# Altium PCB GripperBottomBoard.PcbDoc (part 4 of 4)
Units mm, origin at the board's own origin, x right, y up, seen from the top; angles counter-clockwise.
Board outline 79.5 x 85 mm, 6 copper layers (Top Layer, GND 01, SIG 01, PWR, GND 02, Bottom Layer), stack 1.705 mm thick; 155 components, 93 nets, 613 pads, 240 vias.
Unrouted connection lines stored in the file: 155.
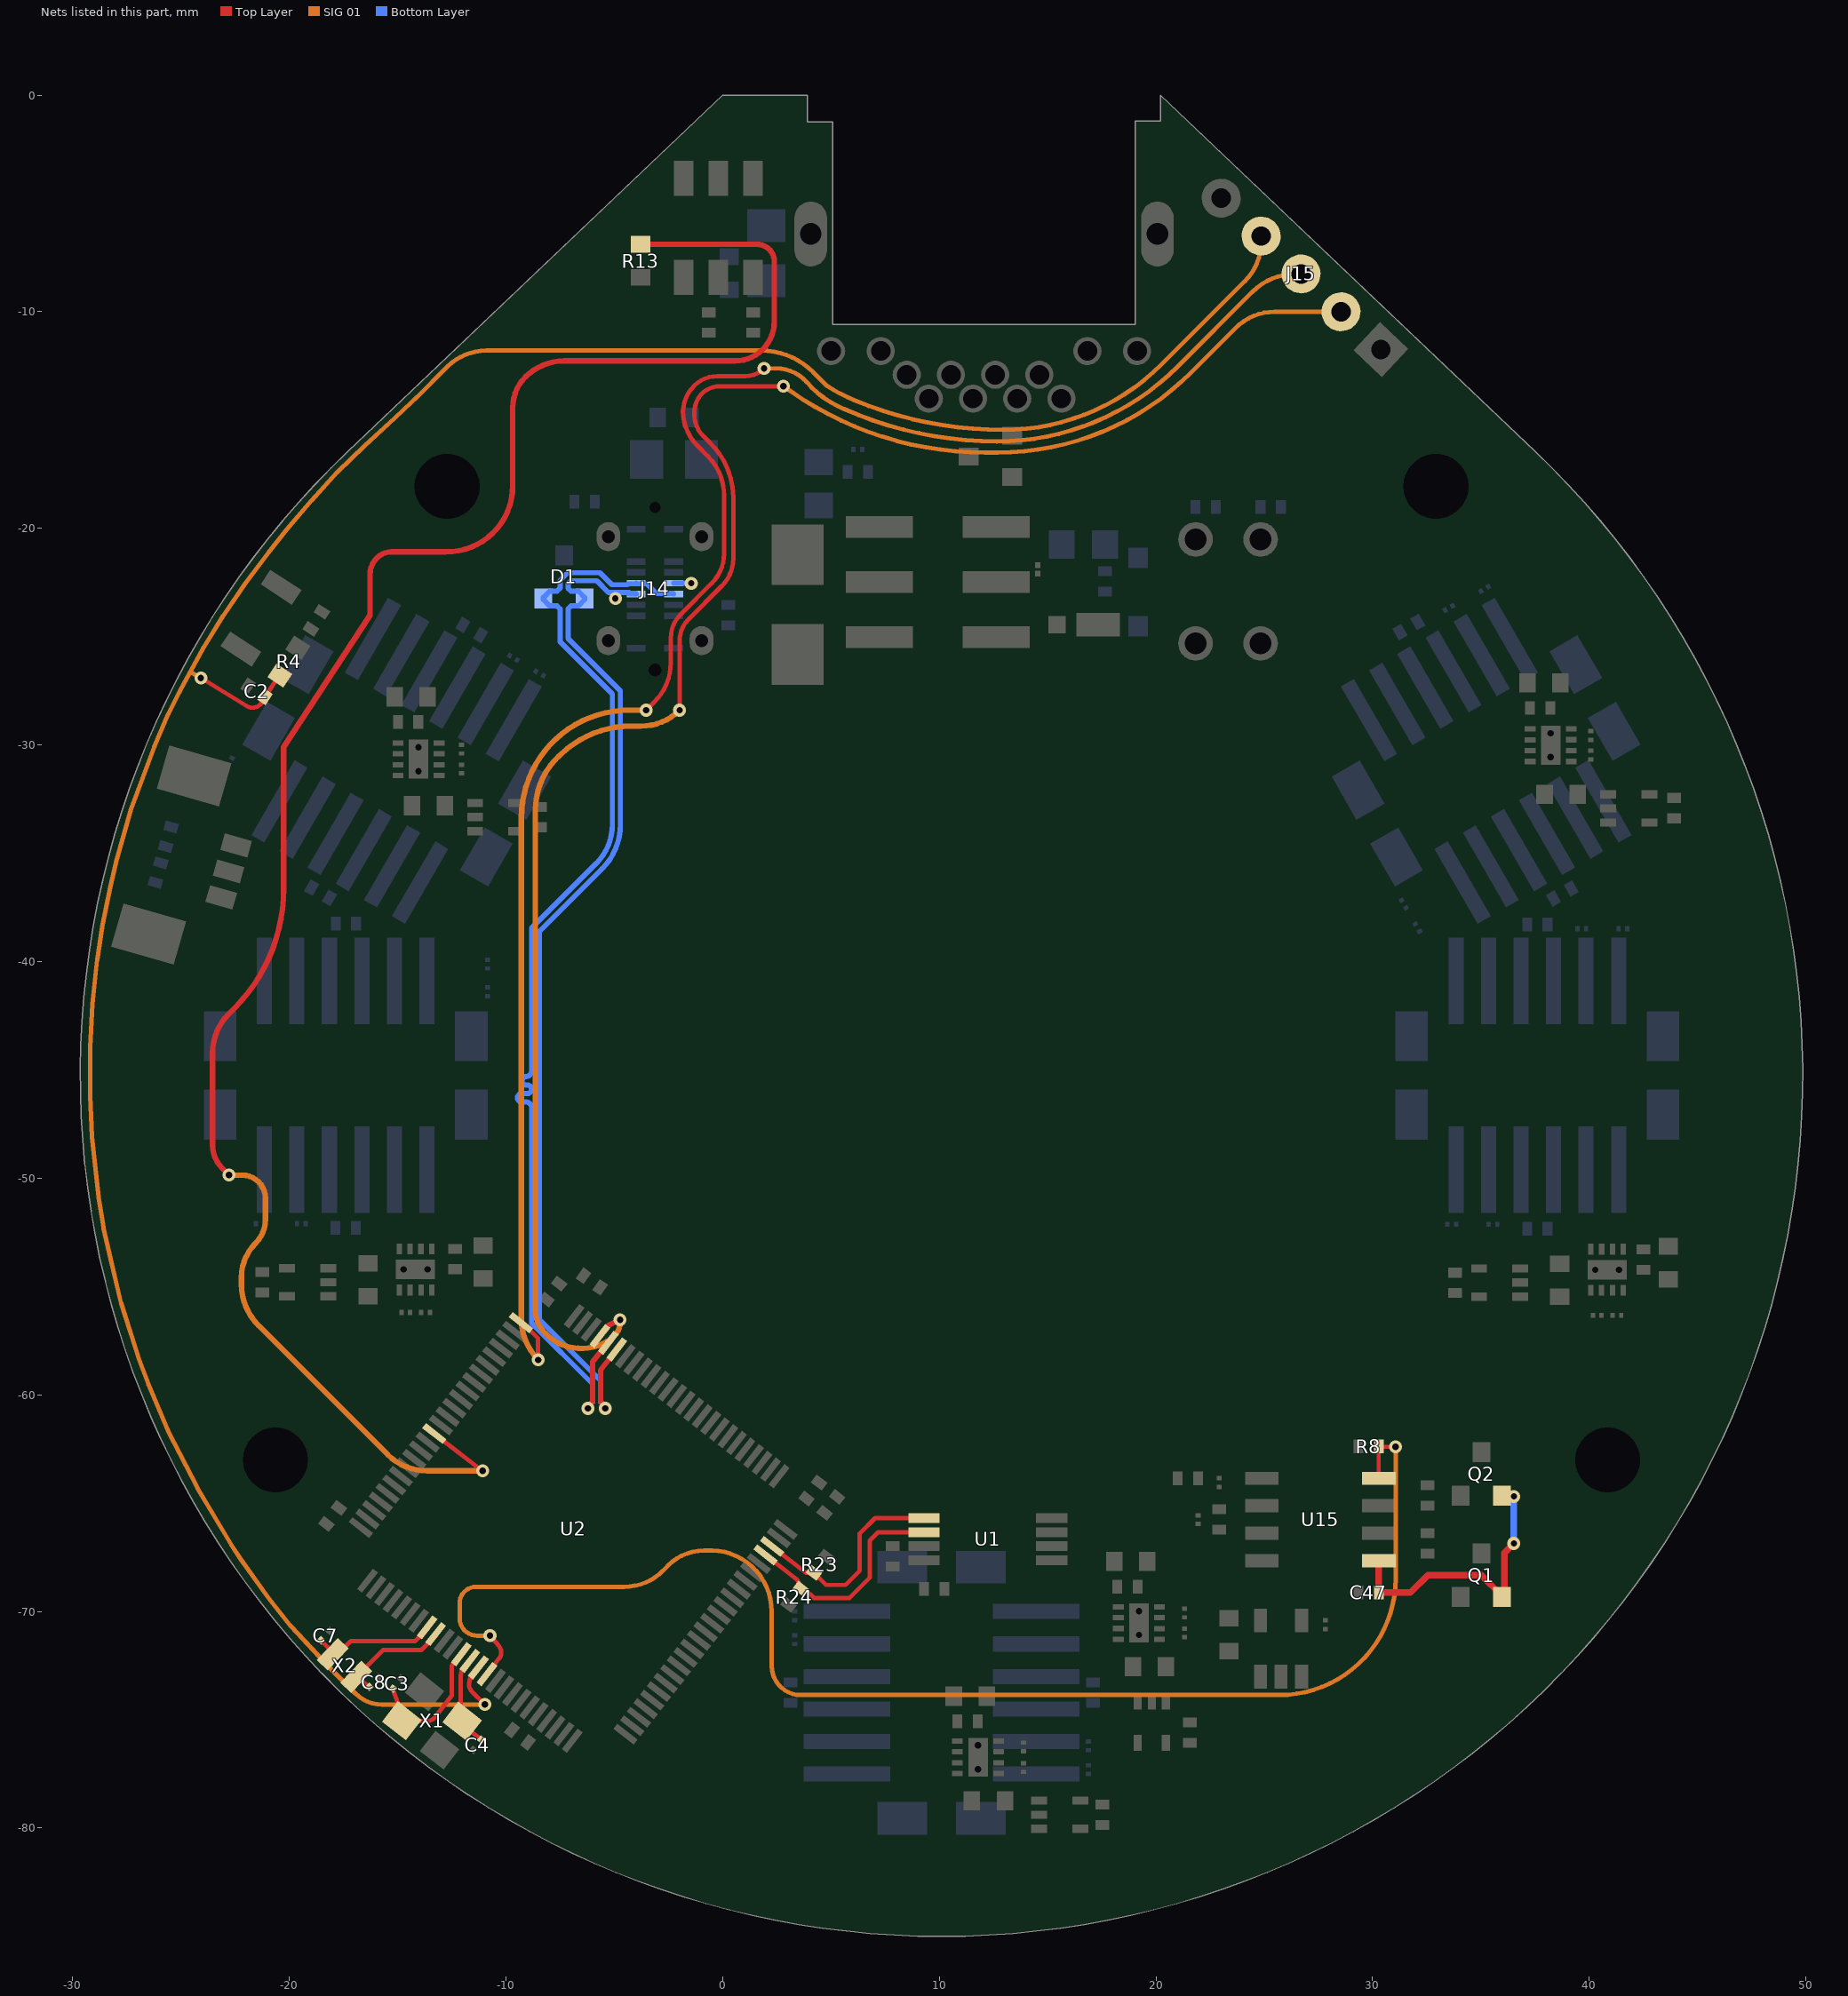
[diagram p7: the nets of this part, all layers, seen from the top]

## Via types
v1: diameter 0.6, hole 0.3, Top Layer to Bottom Layer, tented both sides, 240 vias

## Nets (pads, with @x,y where several pads share a name; then routed paths per layer and width w, separated by ;. In a path a pad name is that pad's centre, name@x,y a point inside that pad or via, vN(x,y) a via of type N, cw(c..) or ccw(c..) an arc to the next point about the centre after c; other vN are vias at no path point) (continued)
NRST: C2.2 J15.4 R4.1 U2.14 | length 125.8
  Top Layer w0.203: v1(-24.083,-26.901) -21.948,-28.21 ccw(c-21.694,-27.802) -21.629,-28.278 ccw(c-21.697,-27.78) -21.275,-28.054 -21.22,-27.968 C2.2@-21.12,-27.775 -20.997,-27.598 -20.615,-27.009 R4.1@-20.437,-26.792 R4.1@-20.431,-26.825 ; U2.14@-11.425,-72.734 -11.437,-72.746 ccw(c-10.8,-73.382) -11.584,-72.94 ccw(c-10.8,-73.382) -11.699,-73.326 ccw(c-10.8,-73.382) -11.7,-73.382 ccw(c-11.246,-73.382) -11.567,-73.704 v1(-10.977,-74.294)
  SIG 01 w0.203: -29.185,-46.201 ccw(c-28.981,-46.197) -29.184,-46.206 -29.109,-48.075 ccw(c-28.906,-48.067) -29.108,-48.088 -28.804,-50.871 ; -29.185,-46.2 -29.189,-45.89 -29.195,-45.883 -29.195,-43.951 -29.096,-41.98 cw(c-28.893,-41.991) -29.095,-41.97 -28.872,-39.915 cw(c-28.67,-39.937) -28.871,-39.907 ; -28.871,-39.906 -28.637,-38.407 cw(c-28.436,-38.438) -28.635,-38.397 -28.265,-36.588 cw(c-28.066,-36.628) -28.264,-36.584 -28.007,-35.43 cw(c-27.808,-35.474) -28.004,-35.419 -27.306,-32.952 cw(c-27.111,-33.006) -27.301,-32.935 -26.229,-30.075 cw(c-26.039,-30.146) -26.226,-30.066 -25.586,-28.569 cw(c-25.399,-28.649) -25.58,-28.555 -25.072,-27.572 -24.814,-27.071 cw(c-24.633,-27.163) -24.811,-27.066 -24.57,-26.626 -23.946,-25.486 cw(c-23.767,-25.584) -23.94,-25.477 -23.048,-24.026 cw(c-22.874,-24.132) -23.042,-24.018 -22.028,-22.528 cw(c-21.859,-22.641) -22.022,-22.519 -20.977,-21.134 cw(c-20.814,-21.256) -20.974,-21.13 -20.108,-20.041 cw(c-19.949,-20.167) -20.104,-20.036 -18.984,-18.717 -17.779,-17.403 cw(c-17.629,-17.541) -17.77,-17.395 -16.53,-16.194 cw(c-16.388,-16.34) -16.526,-16.191 -15.124,-14.893 -14.357,-14.178 -14.292,-14.113 cw(c-11.388,-17.017) -14.112,-13.943 -12.708,-12.54 cw(c-10.912,-14.336) -10.912,-11.796 1.792,-11.796 cw(c1.794,-15.154) 4.168,-12.778 4.775,-13.385 4.789,-13.4 ccw(c8.945,-7.157) 6.071,-14.084 ccw(c12.95,2.506) 12.961,-15.454 ccw(c12.958,-5.129) 20.259,-12.429 24.109,-8.579 ccw(c22.313,-6.783) 24.853,-6.783 J15.4@24.853,-6.507 ; -28.804,-50.872 ccw(c-28.602,-50.849) -28.803,-50.882 -28.602,-52.13 -28.576,-52.292 ccw(c-28.375,-52.259) -28.574,-52.305 -28.245,-53.72 -27.764,-55.771 ccw(c-27.566,-55.724) -27.76,-55.787 -26.926,-58.389 -26.501,-59.525 ; -26.501,-59.526 ccw(c-26.311,-59.454) -26.498,-59.532 -25.61,-61.622 ; -25.609,-61.623 ccw(c-25.423,-61.542) -25.604,-61.634 -24.227,-64.333 ; -24.537,-26.644 v1(-24.083,-26.901) ; -24.227,-64.333 ccw(c-24.046,-64.24) -24.22,-64.345 -22.67,-66.933 -22.253,-67.572 -20.985,-69.336 ; -20.985,-69.337 ccw(c-20.82,-69.217) -20.981,-69.341 -20.471,-69.997 -19.916,-70.687 ccw(c-19.758,-70.559) -19.907,-70.697 ; -19.907,-70.698 -18.098,-72.64 -16.95,-73.787 ; -16.949,-73.788 ccw(c-15.727,-72.566) -15.727,-74.294 -15.726,-74.294 v1(-10.977,-74.294)
OSC_IN: C7.2 U2.8 X2.1 | length 5.8
  Top Layer w0.203: C7.2@-18.541,-71.345 -18.516,-71.369 -18.252,-71.624 -18.243,-71.633 -18.135,-71.766 X2.1@-17.991,-71.974 -17.763,-71.974 -17.16,-71.371 -14.196,-71.371 -13.637,-70.812 U2.8@-13.637,-70.735
OSC_OUT: C8.2 U2.9 X2.2 | length 5
  Top Layer w0.203: X2.2@-16.91,-73.03 -16.715,-73.17 -16.332,-73.445 C8.2@-16.304,-73.486 ; X2.2@-16.388,-72.832 -16.561,-72.665 -15.675,-71.78 -13.903,-71.78 -13.243,-71.12 U2.9@-13.243,-71.043
R: R13.2 U2.89 | length 90.8
  Top Layer w0.203: U2.89@-13.311,-61.79 -12.225,-62.638 v1(-11.083,-63.508)
  Top Layer w0.254: v1(-22.782,-49.856) -23.095,-49.543 cw(c-22.011,-48.459) -23.544,-48.459 -23.544,-44.219 cw(c-21.004,-44.219) -22.8,-42.423 -22.559,-42.182 ccw(c-28.106,-36.632) -20.26,-36.632 -20.26,-30.096 -16.28,-24.027 -16.28,-22.146 cw(c-15.176,-22.146) -15.958,-21.366 cw(c-15.277,-22.044) -15.277,-21.083 -12.783,-21.083 ccw(c-12.729,-18.046) -9.691,-18.046 -9.691,-14.426 cw(c-7.696,-14.426) -9.106,-13.016 cw(c-7.31,-14.812) -7.31,-12.272 0.574,-12.272 ; R13.2@-3.785,-6.886 1.581,-6.886 cw(c1.581,-7.692) 1.927,-6.964 cw(c1.581,-7.692) 2.309,-7.346 cw(c1.581,-7.692) 2.388,-7.692 2.388,-10.437 ; 0.575,-12.272 ccw(c0.575,-10.473) 1.847,-11.745 ccw(c0.538,-10.438) 2.388,-10.438
  SIG 01 w0.254: v1(-22.782,-49.856) -22.172,-49.856 cw(c-22.172,-50.923) -21.106,-50.923 -21.106,-51.902 cw(c-22.667,-51.902) -21.562,-53.005 ccw(c-20.001,-54.568) -22.21,-54.566 -22.21,-54.9 ccw(c-19.536,-54.898) -21.427,-56.789 -21.426,-56.79 -15.451,-62.765 ccw(c-13.655,-60.968) -13.655,-63.508 v1(-11.083,-63.508)
SCLK: R24.2 U1.6 U2.47 | length 10.4
  Top Layer w0.203: U2.47@1.982,-67.392 2.375,-67.699 3.18,-68.328 3.419,-68.515 3.458,-68.554 3.524,-68.721 R24.2@3.616,-68.954 3.791,-68.954 4.211,-69.374 5.859,-69.374 6.787,-68.447 6.787,-66.732 7.183,-66.336 U1.6@9.291,-66.336
SDA: R23.2 U1.5 U2.48 | length 9.9
  Top Layer w0.203: U2.48@2.29,-66.998 2.683,-67.305 3.839,-68.209 R23.2@4.205,-68.209 4.771,-68.774 5.671,-68.774 6.328,-68.117 6.328,-66.399 7.04,-65.686 U1.5@9.291,-65.686
SPLIT: C47.2 Q1.2 Q2.2 U15.5 | length 12.8
  Top Layer w0.305: U15.5@30.283,-67.656 C47.2@30.283,-69.13 31.742,-69.13 32.546,-68.326 35.017,-68.326 Q1.2@35.967,-69.276 ; Q1.2@35.967,-69.326 36.075,-69.219 36.075,-67.299 v1(36.517,-66.856)
  Bottom Layer w0.305: v1(36.517,-66.856) v1(36.517,-64.688)
STB: R8.2 U2.15 U15.8 | length 65.1
  Top Layer w0.178: U15.8@30.283,-63.846 R8.2@30.283,-62.373 30.306,-62.397 v1(31.058,-62.397)
  Top Layer w0.203: U2.15@-10.879,-72.89 -10.571,-72.498 -10.302,-72.153 ; v1(-10.736,-71.115) -10.333,-71.591 ; -10.332,-71.592 cw(c-10.687,-71.893) -10.288,-72.132 cw(c-10.462,-72.027) -10.301,-72.152
  SIG 01 w0.203: v1(-10.736,-71.115) -11.338,-71.115 cw(c-11.338,-70.312) -12.141,-70.312 -12.141,-69.625 cw(c-11.375,-69.625) -11.375,-68.859 -4.536,-68.859 ccw(c-4.536,-66.319) -2.946,-68.3 -2.533,-67.887 cw(c-0.858,-69.563) -0.858,-67.193 -0.784,-67.187 cw(c-0.56,-70) 2.262,-70 2.262,-72.513 ccw(c3.605,-72.513) 3.605,-73.856 25.687,-73.856 ccw(c25.687,-68.485) 31.058,-68.485 v1(31.058,-62.397)
SWCLK: J15.3 U2.76 | length 84.4
  Top Layer w0.203: U2.76@-9.31,-56.668 -9.241,-56.668 -8.517,-57.392 v1(-8.517,-58.386) ; v1(-3.529,-28.393) -3.139,-28.003 ccw(c-4.935,-26.207) -2.395,-26.207 -2.395,-25.077 cw(c-0.825,-25.077) -1.935,-23.967 -0.495,-22.527 ccw(c-1.845,-21.176) 0.064,-21.176 0.064,-18.469 ccw(c-2.476,-18.469) -0.012,-17.852 ccw(c-2.476,-18.469) -0.68,-16.673 -1.163,-16.19 cw(c0.479,-14.548) -1.828,-14.813 -1.828,-14.808 cw(c-0.053,-14.673) -1.312,-13.415 cw(c-0.251,-14.475) -0.25,-12.975 1.051,-12.975 ccw(c1.051,-11.755) v1(1.914,-12.618)
  SIG 01 w0.203: v1(1.914,-12.618) 2.472,-12.618 cw(c2.473,-14.491) 3.866,-13.238 ccw(c7.366,-10.209) 3.867,-13.239 ccw(c7.366,-10.209) 5.617,-14.495 ccw(c12.664,1.403) 12.664,-15.986 ccw(c12.665,-4.199) 21.001,-12.533 24.459,-9.075 cw(c26.441,-11.057) J15.3@26.694,-8.265
  SIG 01 w0.254: v1@-8.505,-58.375 cw(c-6.61,-56.48) -9.29,-56.479 -9.29,-33.371 cw(c-4.312,-33.371) -4.312,-28.393 v1(-3.529,-28.393)
SWDIO: J15.2 U2.72 | length 88.2
  Top Layer w0.203: U2.72@-6,-57.664 U2.72@-5.956,-57.601 ; v1(-1.987,-28.393) -1.977,-28.384 -1.977,-25.059 ; -1.98,-25.145 cw(c-0.667,-25.145) -1.977,-25.059 ; -0.899,-15.736 cw(c0.094,-14.743) -1.311,-14.762 -1.311,-14.738 cw(c0.027,-14.678) -0.997,-13.816 cw(c-0.131,-14.632) -0.131,-13.442 v1(2.809,-13.442) ; -0.898,-15.737 -0.563,-16.073 cw(c-3.096,-18.609) 0.489,-18.608 0.489,-21.393 ; 0.489,-21.394 cw(c-1.294,-21.394) -0.034,-22.655 -1.595,-24.216 ccw(c-0.667,-25.145) -1.977,-25.059 ; J15.2@28.273,-9.739 J15.2@28.538,-10.003
  Top Layer w0.254: U2.72@-5.963,-57.661 -5.931,-57.62 U2.72@-5.67,-57.289 -5.369,-56.925 -5.297,-56.833 cw(c-5.096,-56.989) -5.206,-56.76 v1(-4.734,-56.535)
  SIG 01 w0.203: v1(2.809,-13.442) 3.095,-13.643 ccw(c12.109,-0.856) 12.111,-16.501 ; 12.112,-16.501 12.464,-16.501 ccw(c12.67,1.653) 12.69,-16.502 ccw(c12.69,-3.868) 21.625,-12.801 23.679,-10.747 cw(c25.475,-12.543) 25.475,-10.003 J15.2@28.538,-10.003
  SIG 01 w0.254: v1(-4.734,-56.535) -4.734,-56.653 cw(c-5.576,-56.653) -4.98,-57.248 cw(c-6.435,-55.793) -6.433,-57.851 cw(c-6.556,-55.594) -8.205,-57.139 cw(c-7.209,-56.108) -8.643,-56.108 -8.643,-33.016 -8.643,-33.008 cw(c-5.246,-33.006) -7.589,-30.547 -7.456,-30.42 cw(c-4.233,-33.802) -4.233,-29.13 -3.765,-29.13 ccw(c-3.765,-26.615) v1(-1.987,-28.393)
USB_N: D1.1 J14.A7 J14.B7 U2.70 | length 50.6
  Top Layer w0.241: v1(-5.419,-60.625) -5.419,-60.528 -5.637,-60.311 -5.637,-58.854 -5.186,-58.276 U2.70@-4.882,-57.905 U2.70@-4.919,-57.905
  Bottom Layer w0.241: v1(-5.419,-60.625) -5.419,-60.528 -5.637,-60.311 -5.637,-59.341 -8.452,-56.525 -8.452,-38.603 -5.57,-35.722 ccw(c-7.623,-33.669) -5.569,-35.72 ccw(c-7.623,-33.669) -4.72,-33.669 -4.72,-27.497 -7.137,-25.08 -7.137,-23.722 -6.996,-23.58 -6.661,-23.58 -6.372,-23.291 D1.1@-6.372,-23.241 -6.372,-23.191 -6.661,-22.902 -6.996,-22.902 -7.137,-22.76 -7.137,-22.56 -6.996,-22.419 -5.812,-22.419 -5.263,-22.968 J14.A7@-4.399,-22.968 ; J14.B7@-2.259,-22.534 v1(-1.449,-22.534) ; J14.A7@-4.399,-22.968 -4.325,-22.968 -4.325,-22.983 J14.A7@-4.304,-23.004 ; J14.A7@-4.399,-22.968 -4.362,-23.004 J14.A7@-4.304,-23.004 ; J14.A7@-4.304,-23.004 -4.274,-23.034 J14.A7@-3.989,-23.034 -4.019,-23.004 J14.A7@-4.304,-23.004
  other v1: -4.953,-23.241
USB_P: D1.2 J14.A6 J14.B6 U2.71 | length 53.6
  Top Layer w0.241: v1(-6.222,-60.625) -6.222,-60.528 -6.005,-60.311 -6.005,-58.469 -5.594,-57.957 U2.71@-5.276,-57.597
  Bottom Layer w0.241: v1(-6.222,-60.625) -6.222,-60.528 -6.005,-60.311 -6.005,-59.493 -8.82,-56.678 -8.82,-50.956 -8.82,-46.991 -8.82,-46.847 -8.82,-46.726 ccw(c-9.062,-46.726) -9.062,-46.485 -9.272,-46.485 cw(c-9.272,-46.288) -9.272,-46.091 -9.017,-46.091 ccw(c-9.017,-45.894) -9.017,-45.697 -9.062,-45.697 cw(c-9.062,-45.5) -9.062,-45.304 ccw(c-9.062,-45.062) -8.82,-45.062 -8.82,-42.714 -8.82,-38.451 -5.832,-35.463 ccw(c-7.628,-33.667) -5.088,-33.667 -5.088,-27.649 -7.506,-25.232 -7.506,-23.722 -7.647,-23.58 -7.982,-23.58 -8.272,-23.291 D1.2@-8.272,-23.241 -8.272,-23.191 -7.982,-22.902 -7.647,-22.902 -7.506,-22.76 -7.506,-22.408 -7.149,-22.051 -5.659,-22.051 -5.11,-22.6 -4.399,-22.6 -4.362,-22.563 -4.019,-22.563 J14.A6@-3.989,-22.534 -3.96,-22.563 -3.497,-22.563 -3.056,-23.004 -2.289,-23.004 J14.B6@-2.259,-23.034
XIN: C3.2 U2.12 X1.1 | length 6.5
  Top Layer w0.203: C3.2@-15.213,-73.558 -15.205,-73.626 -14.969,-74.284 X1.1@-14.804,-75.046 -14.051,-75.053 -13.63,-75.053 ccw(c-13.63,-74.606) -13.278,-74.88 -12.507,-73.884 -12.507,-72.5 -12.381,-72.349 U2.12@-12.061,-71.966
XOUT: C4.2 U2.13 X1.3 | length 4.1
  Top Layer w0.203: X1.3@-12.024,-75.06 cw(c-11.875,-74.911) -12.086,-74.911 -12.086,-72.967 cw(c-11.424,-72.967) -11.892,-72.499 U2.13@-11.667,-72.274 ; X1.3@-12.005,-75.217 -11.626,-75.523 -11.175,-75.875 C4.2@-11.142,-75.912
pads on no net: J1.MP1 J1.MP2 J2.MP1 J2.MP2 J3.MP1 J3.MP2 J4.MP1 J4.MP2 J5.MP1 J5.MP2 J6.MP1 J6.MP2 J7.MP1 J7.MP2 J8.MP1 J8.MP2 J10.S1 J10.S2 J11.1 J11.2 J11.3 J11.6 J11.9 J11.10 J11.11 J11.12 J12.MP1 J12.MP2 J13.MP1 J13.MP2 J14.A4 J14.A8 J14.A9 J14.B4 J14.B8 J14.B9 J14.MH U2.7 U2.18 U2.23 U2.32 U2.34 U2.35 U2.36 U2.43 U2.44 U2.45 U2.46 U2.51 U2.53 U2.54 U2.61 U2.62 U2.63 U2.64 U2.65 U2.66 U2.67 U2.68 U2.69 U2.77 U2.78 U2.79 U2.80 U2.92 U2.93 U2.95 U2.96 U16.1

## Polygon pours and split planes (outlines as drawn)
+12V on PWR "+12V_L04_P001" (solid, pour order 1): -15.25,-45.261 ccw(c10.086,-45.261) 10.086,-70.598 ccw(c10.086,-45.261) 35.423,-45.261 ccw(c10.086,-45.261) 10.086,-19.925 ccw(c10.086,-45.261)
+3V3# on PWR "+3V3#_L04_P047" (solid, pour order 47): -17.293,-16.446 0,0 5.081,0 5.081,-9.373 19.048,-9.373 19.048,0 20.202,0 37.495,-16.446 cw(c10.101,-45.25)
+5V# on PWR "+5V#_L04_P002" (solid, pour order 2): -21.254,-45.25 ccw(c10.101,-45.25) 10.101,-76.604 ccw(c10.101,-45.25) 41.455,-45.25 ccw(c10.101,-45.25) 10.101,-13.896 ccw(c10.101,-45.25)
+12V on Top Layer "+12V_L01_P079" (solid, pour order 79): 11.086,-76.103 11.086,-73.584 12.573,-72.098 12.573,-68.963 11.358,-68.963 11.358,-71.72 10.164,-72.913 10.164,-75.681 10.586,-76.103
+12V on Top Layer "+12V_L01_P078" (solid, pour order 78): 18.514,-69.909 18.514,-65.661 16.87,-65.661 16.87,-68.792 17.987,-69.909
+12V on Top Layer "+12V_L01_P077" (solid, pour order 77): 47.473,-51.799 47.172,-53.524 41.445,-53.524 41.445,-53.024 42.671,-51.799
+12V on Top Layer "+12V_L01_P076" (solid, pour order 76): -13.549,-53.51 -13.549,-53.01 -12.292,-51.753 -9.832,-51.753 -9.832,-53.51
+12V on Top Layer "+12V_L01_P055" (solid, pour order 55): -6.298,-25.091 -7.288,-24.101 -10.505,-24.101 -14.712,-24.101 -15.696,-25.084 -15.696,-30.031 -14.738,-30.031 -14.738,-26.571 -13.969,-25.802 -8.203,-25.802 -8.203,-28.419 -5.453,-31.168 -1.363,-31.168 -1.363,-29.257 -4.748,-29.257 -6.298,-27.707
+12V on Top Layer "+12V_L01_P075" (solid, pour order 75): 28.118,-30.171 28.118,-29.41 cw(c29.186,-29.41) 29.186,-28.342 35.972,-28.342 cw(c35.974,-29.384) 37.016,-29.384 37.524,-29.384 37.524,-26.689 29.138,-26.689 ccw(c29.138,-29.104) 26.722,-29.104 26.722,-30.171
M6_OUT2 on Top Layer "M6_OUT2_L01_P074" (solid, pour order 74): 13.26,-71.297 15.067,-71.297 15.875,-72.105 17.994,-72.105 18.514,-71.586 18.514,-71.16 17.92,-71.16 17.537,-71.548 16.378,-71.548 15.366,-70.535 13.26,-70.535
M6_OUT1 on Top Layer "M6_OUT1_L01_P073" (solid, pour order 73): 13.26,-68.963 13.26,-69.784 16.455,-69.784 17.075,-70.405 18.508,-70.405 18.514,-70.411 18.514,-70.1 17.953,-70.1 16.816,-68.963
M4_OUT1 on Top Layer "M4_OUT1_L01_P068" (solid, pour order 68): 30.532,1976.255 30.532,-32.991 33.402,-32.991 33.402,-43.913 34.469,-43.913 34.469,-32.203 31.574,-32.203 31.574,-29.892 37.519,-29.892 37.519,-29.61 36.927,-29.61 36.319,-29.003 30.354,-29.003
M4_OUT2 on Top Layer "M4_OUT2_L01_P069" (solid, pour order 69): 34.825,-31.949 34.825,-43.913 35.917,-43.913 35.917,-31.949 36.631,-31.949 37.516,-31.064 37.516,-30.636 36.91,-30.636 36.409,-31.136 31.802,-31.136 31.802,-31.949
M3_OUT2 on Top Layer "M3_OUT2_L01_P063" (solid, pour order 63): 40.032,-52.686 39.867,-52.522 39.867,-50.504 41.068,-49.303 41.068,-35.226 40.077,-35.226 40.077,-49.049 39.194,-49.932 39.194,-52.955 39.763,-53.524 40.194,-53.524 40.194,-52.848
M3_OUT1 on Top Layer "M3_OUT1_L01_P062" (solid, pour order 62): 42.419,-51.798 41.193,-53.024 41.193,-53.524 40.943,-53.524 40.943,-52.387 41.403,-51.927 41.403,-35.226 42.419,-35.226
M5_OUT2 on Top Layer "M5_OUT2_L01_P060" (solid, pour order 60): 10.586,-77.355 10.357,-77.584 9.202,-77.584 8.973,-77.355 7.764,-77.355 7.52,-77.11 7.52,-75.586 6.58,-75.586 6.58,-77.542 7.088,-78.05 10.641,-78.05 11.086,-77.605 11.086,-77.355
M5_OUT1 on Top Layer "M5_OUT1_L01_P061" (solid, pour order 61): 10.397,-76.356 9.628,-75.586 7.774,-75.586 7.774,-77.105 8.688,-77.105 8.688,-76.314 8.823,-76.179 9.535,-76.179 9.961,-76.606 11.086,-76.606 11.086,-76.356 11.086,-76.606 11.086,-76.356
M1_OUT2 on Top Layer "M1_OUT2_L01_P059" (solid, pour order 59): -14.301,-34.848 -14.037,-34.583 -14.037,-33.789 -15.239,-33.789 -15.239,-50.136 -15.848,-50.745 -15.848,-52.712 -15.05,-53.51 -14.8,-53.51 -14.8,-53.003 -15.162,-52.641 -15.162,-51.431 -14.301,-50.57
M1_OUT1 on Top Layer "M1_OUT1_L01_P058" (solid, pour order 58): -13.749,-34.169 -13.749,-52.09 -14.051,-52.38 -14.051,-53.51 -13.801,-53.51 -13.801,-53.01 -12.648,-51.856 -12.648,-37.43 -12.838,-37.24 -12.838,-35.339 -12.43,-34.932 -12.43,-34.169
M2_OUT2 on Top Layer "M2_OUT2_L01_P052" (solid, pour order 52): -17.118,-30.019 -17.118,-31.461 -15.935,-31.461 ccw(c-15.935,-30.852) -15.504,-31.283 -14.738,-31.283 -14.741,-31.286 -14.741,-32.051 -17.398,-32.051 -17.398,-42.947 -18.337,-43.887 -20.039,-43.887 -20.039,-42.922 -19.074,-42.922 -18.337,-42.185 -18.337,-31.293 cw(c-15.844,-31.293) -17.607,-29.53
M2_OUT1 on Top Layer "M2_OUT1_L01_P050" (solid, pour order 50): -18.515,-30.962 -18.515,-42.668 -20.298,-42.668 -20.298,-43.882 -21.392,-43.882 -21.392,-41.804 -19.684,-41.804 -19.684,-30.444 -17.223,-26.677 -16,-27.852 -16,-29.895 -15.612,-30.284 -14.738,-30.284 -14.738,-30.534 -16.221,-30.534 -17.398,-29.357
GND on Top Layer "GND_L01_P046" (solid, remove dead copper, pour order 46): -17.293,-16.446 0,0 5.081,0 5.081,-9.373 19.048,-9.373 19.048,0 20.202,0 37.495,-16.446 cw(c10.101,-45.25)
GND on Bottom Layer "GND_L06_P049" (solid, remove dead copper, pour order 49): -17.293,-16.446 0,0 5.081,0 5.081,-9.373 19.048,-9.373 19.048,0 20.202,0 37.495,-16.446 cw(c10.101,-45.25)
+5V# on Bottom Layer "+5V#_L06_P080" (solid, pour order 80): 2.808,-73.992 2.808,-74.85 8.466,-74.85 12.461,-73.509 16.771,-73.509 18.266,-73.509 18.266,-72.65 12.461,-72.65 8.466,-73.992
+12V on Bottom Layer "+12V_L06_P022" (solid, pour order 22): 28.068,-25.011 28.068,-30.146 26.697,-30.146 26.697,-23.686 37.963,-17.547 cw(c10.087,-45.262) -28.089,-54.631 -13.461,-54.631 -12.349,-53.52 -12.349,-51.611 -9.803,-51.611 -9.803,-57.781 -24.872,-57.781 ccw(c10.101,-45.25) 37.27,-19.914
M4_OUT1 on Bottom Layer "M4_OUT1_L06_P072" (solid, pour order 72): 29.137,-26.946 31.137,-30.41 31.467,-31.032 31.467,-31.975 30.556,-31.975 30.533,-30.898 28.473,-27.33
M4_OUT2 on Bottom Layer "M4_OUT2_L06_P071" (solid, pour order 71): 29.692,-26.626 31.805,-30.287 31.805,-31.975 32.735,-31.975 32.735,-30.178 30.436,-26.196
+5V# on Bottom Layer "+5V#_L06_P067" (solid, pour order 67): 30.569,-24.827 33.129,-29.26 36.75,-32.545 38.785,-36.071 38.808,-36.463 39.426,-37.533 40.185,-37.095 37.356,-32.195 33.735,-28.91 31.735,-25.446 31.604,-24.924 31.303,-24.403
+5V# on Bottom Layer "+5V#_L06_P066" (solid, pour order 66): 37.842,-46.676 36.501,-45.335 36.501,-37.968 37.36,-37.968 37.36,-44.873 38.701,-46.214 38.701,-53.311 37.842,-53.311
M3_OUT2 on Bottom Layer "M3_OUT2_L06_P065" (solid, pour order 65): 38.049,-31.796 40.075,-35.304 40.079,-36.348 41.073,-36.348 41.073,-35.126 38.875,-31.319
M3_OUT1 on Bottom Layer "M3_OUT1_L06_P064" (solid, pour order 64): 39.348,-31.045 41.399,-34.598 41.406,-36.348 42.419,-36.348 42.419,-34.458 40.174,-30.568
+5V# on Bottom Layer "+5V#_L06_P057" (solid, pour order 57): -17.16,-52.613 -17.16,-47.772 -18.498,-43.565 -18.511,-37.216 -18.207,-36.69 -17.469,-37.103 -17.631,-37.836 -17.631,-43.417 -16.299,-47.605 -16.299,-52.613
+5V# on Bottom Layer "+5V#_L06_P056" (solid, pour order 56): -13.594,-26.002 -14.761,-28.022 -15.877,-32.639 -18.511,-37.216 -17.767,-37.645 -15.175,-33.156 -14.026,-28.444 -12.878,-26.45 -13.604,-26.019
M2_OUT2 on Bottom Layer "M2_OUT2_L06_P054" (solid, pour order 54): -14.139,-23.946 -16.48,-28.001 -17.495,-29.121 -18.137,-30.203 -17.294,-30.811 -13.533,-24.296
M2_OUT1 on Bottom Layer "M2_OUT1_L06_P053" (solid, pour order 53): -15.438,-23.196 -17.941,-27.531 -16.992,-28.182 -14.445,-23.77
GND on SIG 01 "GND_L03_P045" (solid, remove dead copper, pour order 45): -17.293,-16.446 0,0 5.081,0 5.081,-9.373 19.048,-9.373 19.048,0 20.202,0 37.495,-16.446 cw(c10.101,-45.25)
+3V3# on SIG 01 "+3V3#_L03_P043" (solid, pour order 43): 22.53,-23.707 28.045,-23.707 28.045,-14.716 19.79,-14.716 19.79,-17.218 4.963,-17.218 1.487,-13.743 -2.638,-13.743 -2.638,-23.707
GND on GND 02 (split plane): 163 vertices, not listed, extent -29.149,-84.49 49.351,-0.51
GND on GND 01 (split plane): 163 vertices, not listed, extent -29.149,-84.49 49.351,-0.51

## Other copper
Top Layer:
  region net GND: -15.74,-66.041 -17.738,-64.48 -17.923,-64.716 -15.925,-66.278
  region net GND: -9.908,-75.954 -8.347,-73.956 -8.583,-73.771 -10.145,-75.77
  region net GND: -13.829,-72.844 -12.268,-70.846 -12.504,-70.661 -14.066,-72.66
  region net GND: -7.147,-57.799 -5.585,-55.8 -5.822,-55.615 -7.383,-57.614
  rectangle net GND: -14.526,-56.926 -13.813,-56.092
  rectangle net GND: 21.196,-70.85 21.949,-70.368
  rectangle net GND: 21.196,-70.891 21.436,-70.173
  rectangle net +3V3#: 15.414,-78.913 17.843,-78.235
  rectangle net +3V3#: 17.333,-20.345 19.409,-18.879
  rectangle net +3V3#: 7.533,-68.155 10.016,-67.411
  rectangle net +3V3#: 33.488,-56.31 34.123,-55.072
  rectangle net +3V3#: 33.488,-55.794 35.278,-55.072
  rectangle net +12V: 41.445,-53.524 44.093,-53.024
  rectangle net +12V: 37.016,-29.384 37.524,-26.689
  region net M4_OUT1: 36.746,-29.877 36.971,-29.649 36.48,-29.163 36.255,-29.39
  rectangle net +3V3#: 42.405,-32.467 44.221,-31.489
  region net M3_OUT1: 40.96,-52.887 41.143,-53.072 41.497,-52.723 41.314,-52.538
  rectangle net +3V3#: -21.556,-56.164 -19.741,-55.043
  region net M1_OUT1: -14.014,-52.887 -13.85,-53.055 -13.5,-52.712 -13.665,-52.544
  rectangle net +5V#: 0.933,-17.954 2.654,-16.14
  rectangle net +3V3#: -9.888,-33.088 -7.521,-32.489
  region net +3V3#: 20.266,-75.7 20.266,-76.43 22.656,-76.43 22.656,-75.7
  rectangle net +12V: 17.987,-69.909 18.514,-67.241
  region net +5V: 8.792,-21.969 0.933,-21.969 0.933,-22.989 8.792,-22.989
  rectangle net +3V3: 14.432,-20.345 16.242,-18.879
  rectangle net +3V3: 11.064,-22.989 15.992,-21.969
  rectangle net +3V3: 14.906,-22.989 15.992,-18.925
  region net GND: -0.958,-77.595 -4.555,-74.785 -4.74,-75.021 -1.143,-77.832
  region net +3V3#: -6.894,-78.077 -5.749,-76.612 -6.467,-76.05 -7.613,-77.516
  rectangle net +12V: 5.684,-25.785 15.833,-23.555
  rectangle net USB_N: -5.07,-23.426 -4.829,-22.413
  rectangle net USB_N: -5.074,-22.654 -1.259,-22.413
  rectangle net +3V3#: 21.325,-15.811 23.46,-14.822
  rectangle net +3V3#: 16.141,-78.923 17.843,-78.492
  region net +3V3#: -17.003,-67.49 -16.131,-66.375 -17.077,-65.636 -17.949,-66.751
  region net +3V3#: -17.045,-67.457 -16.65,-66.952 -18.4,-65.584 -18.795,-66.09
  region net +3V3#: -12.792,-70.37 -12.415,-69.888 -12.876,-69.529 -13.252,-70.01
  region net +3V3#: -13.526,-69.212 -13.762,-69.027 -14.913,-70.5 -14.676,-70.684
  region net +3V3#: -11.556,-70.751 -13.695,-69.079 -13.871,-69.304 -11.732,-70.976
  region net +3V3#: -11.556,-70.751 -11.792,-70.566 -12.943,-72.039 -12.706,-72.224
  rectangle net SPLIT: 35.557,-65.107 36.517,-64.187
  rectangle net +5V#: 21.734,-67.769 22.701,-65.861
  region net +3V3#: -9.009,-76.425 -7.633,-74.664 -7.981,-74.393 -9.356,-76.153
  region net +3V3#: -9.356,-76.153 -6.894,-78.077 -6.503,-77.577 -8.965,-75.653
  region net +3V3#: 9.599,-71.115 9.599,-67.411 8.935,-67.411 8.935,-71.115
  region net +3V3#: -7.015,-56.818 -6.608,-56.297 -8.136,-55.103 -8.543,-55.624
  region net +3V3#: 4.84,-67.912 5.213,-67.434 2.714,-65.481 2.34,-65.959
  region net +3V3#: 3.871,-67.144 5.15,-65.507 4.593,-65.071 3.314,-66.708
  rectangle net +5V#: 21.734,-66.686 25.658,-65.861
  region net +3V3#: 25.121,-70.962 25.121,-69.011 22.927,-69.011 22.927,-70.962
  region net +3V3#: -9.003,-75.117 -8.372,-75.61 -7.633,-74.664 -8.264,-74.172
  rectangle net +5V: 0.933,-22.989 4.654,-18.161
SIG 01:
  rectangle net +3V3: 14.253,-20.359 16.242,-18.879
Bottom Layer:
  rectangle net +5V#: 2.808,-74.85 8.466,-73.992
  rectangle net +3V3#: -8.711,-76.956 -5.973,-76.173
  rectangle net M6_OUT1: 12.461,-70.35 16.461,-69.009
  rectangle net M6_OUT2: 12.461,-71.85 16.461,-70.613
  rectangle net M4_OUT2: 34.948,-43.795 35.755,-38.895
  rectangle net M4_OUT1: 33.448,-43.795 34.254,-38.895
  region net +5V#: 31.284,-24.371 30.148,-25.027 30.512,-25.656 31.648,-25
  rectangle net +5V#: -17.16,-52.613 -15.982,-51.89
  rectangle net M3_OUT2: 39.501,-51.611 40.768,-47.611
  rectangle net M3_OUT1: 41.001,-51.611 42.292,-47.611
  rectangle net M5_OUT1: 7.95,-77.85 8.717,-75.65
  rectangle net M5_OUT1: 3.732,-77.85 8.717,-77.15
  rectangle net M5_OUT2: 3.732,-76.781 7.732,-75.65
  region net GND: -16.168,-32.587 -17.082,-32.059 -19.161,-35.66 -18.247,-36.187
  region net M1_OUT1: -12.482,-34.492 -13.082,-34.145 -15.258,-37.913 -14.658,-38.26
  region net M1_OUT2: -13.599,-33.869 -14.731,-33.215 -16.897,-36.967 -15.765,-37.62
  rectangle net M1_OUT1: -13.999,-51.611 -12.756,-47.611
  rectangle net M1_OUT2: -15.499,-51.611 -14.346,-47.611
  region net +3V3#: -26.88,-35.405 -25.719,-35.737 -25.379,-34.549 -26.539,-34.216
  region net M2_OUT2: -19.299,-38.895 -20.098,-38.895 -20.098,-43.792 -19.299,-43.792
  rectangle net M2_OUT1: -21.499,-43.792 -20.7,-38.895
  rectangle net GND: 2.808,-73.509 8.466,-72.65
  region net +5V#: -11.991,-24.92 -11.63,-24.293 -12.671,-23.692 -13.033,-24.319
  region net GND: -13.669,-28.837 -12.935,-29.26 -10.458,-24.97 -11.191,-24.546
  region net +5V#: -14.84,-28.16 -14.107,-28.584 -11.63,-24.293 -12.363,-23.87
  rectangle net +3V3#: 17.038,-18.33 23.651,-17.027
  rectangle net +3V3: 14.42,-21.4 16.245,-19.126
  rectangle net +12V: 5.997,-25.059 14.106,-23.52
  rectangle net USB_N: -5.193,-23.374 -4.687,-22.93
  rectangle net +3V3#: 21.34,-18.33 23.651,-14.893
  rectangle net +5V#: 0.927,-17.87 6.136,-16.237
  rectangle net +5V: 0.953,-19.973 5.099,-18.171
  region net +3V3#: 19.63,-17.027 17.038,-17.027 17.038,-22.204 19.63,-22.204

## Silkscreen, mask and mechanical layers (free items; w line width, h text height)
Top Overlay:
  text "NRST" at 21.774,-10.543 h1 r46.5
  text "SWCLK" at 23.654,-12.359 h1 r46.5
  text "SWDIO" at 25.489,-14.104 h1 r46.5
  text "+3V3" at 27.248,-15.806 h1 r46.5
  text "NRST" at -19.505,-22.528 h1 r57
Bottom Overlay:
  text "FINGER 1" at -23.663,-29.119 h1 r240
  text "FINGER 2" at 42.974,-29.629 h1 r300
  text "FINGER 1" at -25.612,-48.201 h1 r270
  text "FINGER 2" at 44.795,-48.201 h1 r270
  text "FINGER 3" at 13.026,-66.499 h1
  text "Pro Gripper-Bottom Board" at 21.681,-82.083 h1
  text "Rev-v1.0" at 13.766,-84.066 h1
Dimensions:
  circle w0.127: c-12.718,-18.055 r2.75
  circle w0.127: c-20.643,-63 r2.75
  circle w0.127: c40.845,-63 r2.75
  circle w0.127: c32.92,-18.055 r2.75
  lines w0.013: -27.399,-45.75 ccw(c-25.399,-45.75) -25.399,-47.75 -9.399,-47.75 ccw(c-9.399,-45.75) -7.399,-45.75 -7.399,-44.75 ccw(c-9.399,-44.75) -9.399,-42.75 -25.399,-42.75 ccw(c-25.399,-44.75) -27.399,-44.75 -27.399,-45.75 ; -23.924,-26.183 ccw(c-22.192,-27.183) -23.192,-28.915 -9.336,-36.915 ccw(c-8.336,-35.183) -6.604,-36.183 -6.104,-35.317 ccw(c-7.836,-34.317) -6.836,-32.585 -20.692,-24.585 ccw(c-21.692,-26.317) -23.424,-25.317 -23.924,-26.183 ; 7.601,-79.75 ccw(c9.601,-79.75) 9.601,-81.75 10.601,-81.75 ccw(c10.601,-79.75) 12.601,-79.75 12.601,-65.75 ccw(c10.601,-65.75) 10.601,-63.75 9.601,-63.75 ccw(c9.601,-65.75) 7.601,-65.75 7.601,-79.75 ; 26.305,-35.317 cw(c28.037,-34.317) 27.037,-32.585 40.894,-24.585 cw(c41.894,-26.317) 43.626,-25.317 44.126,-26.183 cw(c42.394,-27.183) 43.394,-28.915 29.537,-36.915 cw(c28.537,-35.183) 26.805,-36.183 26.305,-35.317 ; 27.601,-45.75 ccw(c29.601,-45.75) 29.601,-47.75 45.601,-47.75 ccw(c45.601,-45.75) 47.601,-45.75 47.601,-44.75 ccw(c45.601,-44.75) 45.601,-42.75 29.601,-42.75 ccw(c29.601,-44.75) 27.601,-44.75 27.601,-45.75
  lines w0.127: -27.399,-45.25 -7.399,-45.25 ; -23.674,-25.75 -6.354,-35.75 ; 10.101,-81.75 10.101,-63.75 ; 26.555,-35.75 43.876,-25.75 ; 27.601,-45.248 47.601,-45.248
Board Outline:
  circle w0.254: c10.101,-45.25 r17.76
  circle w0.254: c-20.643,-63 r1.5
  circle w0.254: c32.92,-18.055 r1.5
  circle w0.254: c40.845,-63 r1.5
  circle w0.254: c-12.718,-18.055 r1.5
  lines w0.254: -17.293,-16.446 ccw(c10.101,-45.25) 37.495,-16.446 20.202,0 20.202,-1.203 19.048,-1.203 19.048,-10.593 5.081,-10.593 5.081,-1.228 3.918,-1.228 3.913,0 0,0 -17.293,-16.446
Fabrication:
  drawing of 399 lines, arcs and shapes, not listed
  text "Layer" at 55.556,23.08 h1.52
  text "Name" at 65.968,23.08 h1.52
  text "Material" at 89.583,23.08 h1.52
  text "Thickness" at 111.421,23.08 h1.52
  text "Constant" at 127.927,23.08 h1.52
  text "Board Layer Stack" at 142.402,23.08 h1.52
  text "Top Overlay" at 65.968,20.032 h1.52
  text "Top Solder" at 65.968,16.984 h1.52
  text "Solder Resist" at 89.583,16.984 h1.52
  text "0.50mil" at 111.421,16.984 h1.52
  text "3.5" at 127.927,16.984 h1.52
  text "1" at 55.556,13.936 h1.52
  text "Top Layer" at 65.968,13.936 h1.52
  text "1.38mil" at 111.421,13.936 h1.52
  text "Dielectric 2" at 65.968,10.888 h1.52
  text "PP-006" at 89.583,10.888 h1.52
  text "7.99mil" at 111.421,10.888 h1.52
  text "4.1" at 127.927,10.888 h1.52
  text "2" at 55.556,7.84 h1.52
  text "GND 01" at 65.968,7.84 h1.52
  text "CF-004" at 89.583,7.84 h1.52
  text "1.18mil" at 111.421,7.84 h1.52
  text "Dielectric 4" at 65.968,4.792 h1.52
  text "PP-006" at 89.583,4.792 h1.52
  text "9.84mil" at 111.421,4.792 h1.52
  text "4.1" at 127.927,4.792 h1.52
  text "3" at 55.556,1.744 h1.52
  text "SIG 01" at 65.968,1.744 h1.52
  text "CF-004" at 89.583,1.744 h1.52
  text "1.18mil" at 111.421,1.744 h1.52
  text "Dielectric 1" at 65.968,-1.304 h1.52
  text "FR-4" at 89.583,-1.304 h1.52
  text "23.98mil" at 111.421,-1.304 h1.52
  text "4.8" at 127.927,-1.304 h1.52
  text "4" at 55.556,-4.352 h1.52
  text "PWR" at 65.968,-4.352 h1.52
  text "CF-004" at 89.583,-4.352 h1.52
  text "1.18mil" at 111.421,-4.352 h1.52
  text "Dielectric 5" at 65.968,-7.4 h1.52
  text "PP-006" at 89.583,-7.4 h1.52
  text "9.84mil" at 111.421,-7.4 h1.52
  text "4.1" at 127.927,-7.4 h1.52
  text "5" at 55.556,-10.448 h1.52
  text "GND 02" at 65.968,-10.448 h1.52
  text "CF-004" at 89.583,-10.448 h1.52
  text "1.18mil" at 111.421,-10.448 h1.52
  text "Dielectric 3" at 65.968,-13.496 h1.52
  text "PP-006" at 89.583,-13.496 h1.52
  text "7.99mil" at 111.421,-13.496 h1.52
  text "4.1" at 127.927,-13.496 h1.52
  text "6" at 55.556,-16.544 h1.52
  text "Bottom Layer" at 65.968,-16.544 h1.52
  text "1.38mil" at 111.421,-16.544 h1.52
  text "Bottom Solder" at 65.968,-19.592 h1.52
  text "Solder Resist" at 89.583,-19.592 h1.52
  text "0.50mil" at 111.421,-19.592 h1.52
  text "3.5" at 127.927,-19.592 h1.52
  text "Bottom Overlay" at 65.968,-22.64 h1.52
  text "Total board thickness:" at 55.556,-25.688 h1.52
  text "68.13mil" at 111.421,-25.688 h1.52
Drill Drawing:
  circle w0.254: c-26.015,64.666 r0.508
  circle w0.254: c-26.015,64.666 r0.847
  circle w0.254: c-26.015,41.806 r0.847
  lines w0.254: -26.862,44.77 -25.169,44.77 -25.169,46.463 -26.862,46.463 -26.862,44.77 ; -26.862,49.426 -26.015,48.58 -25.169,49.426 -26.015,50.273 -26.862,49.426 ; -26.862,52.39 -25.169,52.39 -25.169,54.083 -26.862,54.083 -26.862,52.39 ; -26.862,56.623 -26.439,56.623 -26.015,56.2 -25.592,56.623 -25.169,56.623 -25.592,57.046 -25.169,57.47 -25.592,57.47 -26.015,57.893 -26.439,57.47 -26.862,57.47 -26.439,57.046 -26.862,56.623 ; -26.862,60.433 -26.439,60.433 -26.439,60.01 -25.592,60.01 -25.592,60.433 -25.169,60.433 -25.169,61.28 -25.592,61.28 -25.592,61.703 -26.439,61.703 -26.439,61.28 -26.862,61.28 -26.862,60.433 ; -26.862,67.63 -26.862,68.053 -26.439,68.476 -26.862,68.9 -26.862,69.323 -26.439,69.323 -26.015,68.9 -25.592,69.323 -25.169,69.323 -25.169,68.9 -25.592,68.476 -25.169,68.053 -25.169,67.63 -25.592,67.63 -26.015,68.053 -26.439,67.63 -26.862,67.63 ; -26.862,73.133 -25.169,73.133 -26.015,71.44 -26.862,73.133 ; -26.523,45.108 -25.507,45.108 -25.507,46.124 -26.523,46.124 -26.523,45.108
  lines w0.381: -28.381,39.817 282.021,39.817 ; -28.381,74.107 282.021,74.107 ; -14.388,36.007 -14.388,77.917 ; 0.848,36.007 0.848,77.917 ; 29.287,36.007 29.287,77.917 ; 42.137,36.007 42.137,77.917 ; 60.775,36.007 60.775,77.917 ; 98.864,36.007 98.864,77.917 ; 113.846,36.007 113.846,77.917 ; 132.789,36.007 132.789,77.917 ; 191.445,36.007 191.445,77.917 ; 213.131,36.007 213.131,77.917 ; 247.004,36.007 247.004,77.917 ; -28.381,36.007 282.021,36.007 282.021,77.917 -28.381,77.917 -28.381,36.007
  text "Symbol" at -26.095,75.25 h1.83
  text "Count" at -13.245,75.25 h1.83
  text "Hole Size" at 1.991,75.25 h1.83
  text "Plated" at 30.43,75.25 h1.83
  text "Hole Type" at 43.28,75.25 h1.83
  text "Drill Layer Pair" at 61.918,75.25 h1.83
  text "Via/Pad" at 100.007,75.25 h1.83
  text "Pad Shape" at 114.989,75.25 h1.83
  text "Template" at 133.932,75.25 h1.83
  text "Description" at 192.588,75.25 h1.83
  text "Hole Tolerance (+)" at 214.274,75.25 h1.83
  text "Hole Tolerance (-)" at 248.147,75.25 h1.83
  text "1" at -13.245,71.44 h1.52
  text "0.520mm (20.47mil)" at 1.991,71.44 h1.52
  text "NPTH" at 30.43,71.44 h1.52
  text "Round" at 43.28,71.44 h1.52
  text "Top Layer - Bottom Layer" at 61.918,71.44 h1.52
  text "Pad" at 100.007,71.44 h1.52
  text "Rounded" at 114.989,71.44 h1.52
  text "c0hn52" at 133.932,71.44 h1.52
  text "1" at -13.245,67.63 h1.52
  text "0.600mm (23.62mil)" at 1.991,67.63 h1.52
  text "NPTH" at 30.43,67.63 h1.52
  text "Slot" at 43.28,67.63 h1.52
  text "Top Layer - Bottom Layer" at 61.918,67.63 h1.52
  text "Pad" at 100.007,67.63 h1.52
  text "Rounded" at 114.989,67.63 h1.52
  text "c0hn60_72" at 133.932,67.63 h1.52
  text "2" at -13.245,63.82 h1.52
  text "1.000mm (39.37mil)" at 1.991,63.82 h1.52
  text "PTH" at 30.43,63.82 h1.52
  text "Slot" at 43.28,63.82 h1.52
  text "Top Layer - Bottom Layer" at 61.918,63.82 h1.52
  text "Pad" at 100.007,63.82 h1.52
  text "Rounded" at 114.989,63.82 h1.52
  text "r150_300h100_240r75m160_310mx160_310p0" at 133.932,63.82 h1.52
  text "4" at -13.245,60.01 h1.52
  text "0.600mm (23.62mil)" at 1.991,60.01 h1.52
  text "PTH" at 30.43,60.01 h1.52
  text "Slot" at 43.28,60.01 h1.52
  text "Top Layer - Bottom Layer" at 61.918,60.01 h1.52
  text "Pad" at 100.007,60.01 h1.52
  text "Rounded" at 114.989,60.01 h1.52
  text "r135_110h60_85r55" at 133.932,60.01 h1.52
  text "4" at -13.245,56.2 h1.52
  text "1.000mm (39.37mil)" at 1.991,56.2 h1.52
  text "PTH" at 30.43,56.2 h1.52
  text "Round" at 43.28,56.2 h1.52
  text "Top Layer - Bottom Layer" at 61.918,56.2 h1.52
  text "Pad" at 100.007,56.2 h1.52
  text "Rounded" at 114.989,56.2 h1.52
  text "(Mixed)" at 133.932,56.2 h1.52
  text "4" at -13.245,52.39 h1.52
  text "3.000mm (118.11mil)" at 1.991,52.39 h1.52
  text "NPTH" at 30.43,52.39 h1.52
  text "Round" at 43.28,52.39 h1.52
  text "Top Layer - Bottom Layer" at 61.918,52.39 h1.52
  text "Pad" at 100.007,52.39 h1.52
  text "Rounded" at 114.989,52.39 h1.52
  text "c0hn300" at 133.932,52.39 h1.52
  text "5" at -13.245,48.58 h1.52
  text "0.900mm (35.43mil)" at 1.991,48.58 h1.52
  text "PTH" at 30.43,48.58 h1.52
  text "Round" at 43.28,48.58 h1.52
  text "Top Layer - Bottom Layer" at 61.918,48.58 h1.52
  text "Pad" at 100.007,48.58 h1.52
  text "(Mixed)" at 114.989,48.58 h1.52
  text "(Mixed)" at 133.932,48.58 h1.52
  text "12" at -13.245,44.77 h1.52
  text "0.900mm (35.43mil)" at 1.991,44.77 h1.52
  text "PTH" at 30.43,44.77 h1.52
  text "Round" at 43.28,44.77 h1.52
  text "Top Layer - Bottom Layer" at 61.918,44.77 h1.52
  text "Pad" at 100.007,44.77 h1.52
  text "Rounded" at 114.989,44.77 h1.52
  text "c130h90m140mx140p0" at 133.932,44.77 h1.52
  text "252" at -13.245,40.96 h1.52
  text "0.300mm (11.81mil)" at 1.991,40.96 h1.52
  text "PTH" at 30.43,40.96 h1.52
  text "Round" at 43.28,40.96 h1.52
  text "Top Layer - Bottom Layer" at 61.918,40.96 h1.52
  text "(Mixed)" at 100.007,40.96 h1.52
  text "Rounded" at 114.989,40.96 h1.52
  text "(Mixed)" at 133.932,40.96 h1.52
  text "285 Total" at -13.245,37.15 h1.52
  text "Slot definitions :" at -26.095,33.467 h1.52
  text "Routed Path Length" at 0.136,33.467 h1.52
  text "= Calculated from tool start centre position to tool end centre position." at 28.143,33.467 h1.52
  text "Hole Length" at 0.136,30.928 h1.52
  text "= Routed Path Length + Tool Size = Slot length as defined in the PCB layout" at 17.733,30.928 h1.52

## Text inside footprints (layer, text, board x,y; h text height)
J11: Top Overlay "1" at 7.496,-14.272 h0.8; Mechanical 13 "Board Cutout" at 6.45,-6.009 h1
J14: Bottom Overlay "B1" at -1.88,-25.933 h0.5 r90; Bottom Overlay "A1" at -3.886,-19.025 h0.5 r90
LED1: Top Overlay "1" at -1.545,-5.081 h0.5 r90